# Altium PCB Baseboard-SupervisorCore.PcbDoc (part 3 of 8)
Units mm, origin at the board's own origin, x right, y up, seen from the top; angles counter-clockwise.
Board outline 120 x 90 mm, 6 copper layers (Top Layer, SIGNAL-1, PWR, SIGNAL-2, GND-2, Bottom Layer), stack 1.705 mm thick; 419 components, 315 nets, 1504 pads, 603 vias.
Unrouted connection lines stored in the file: 357.
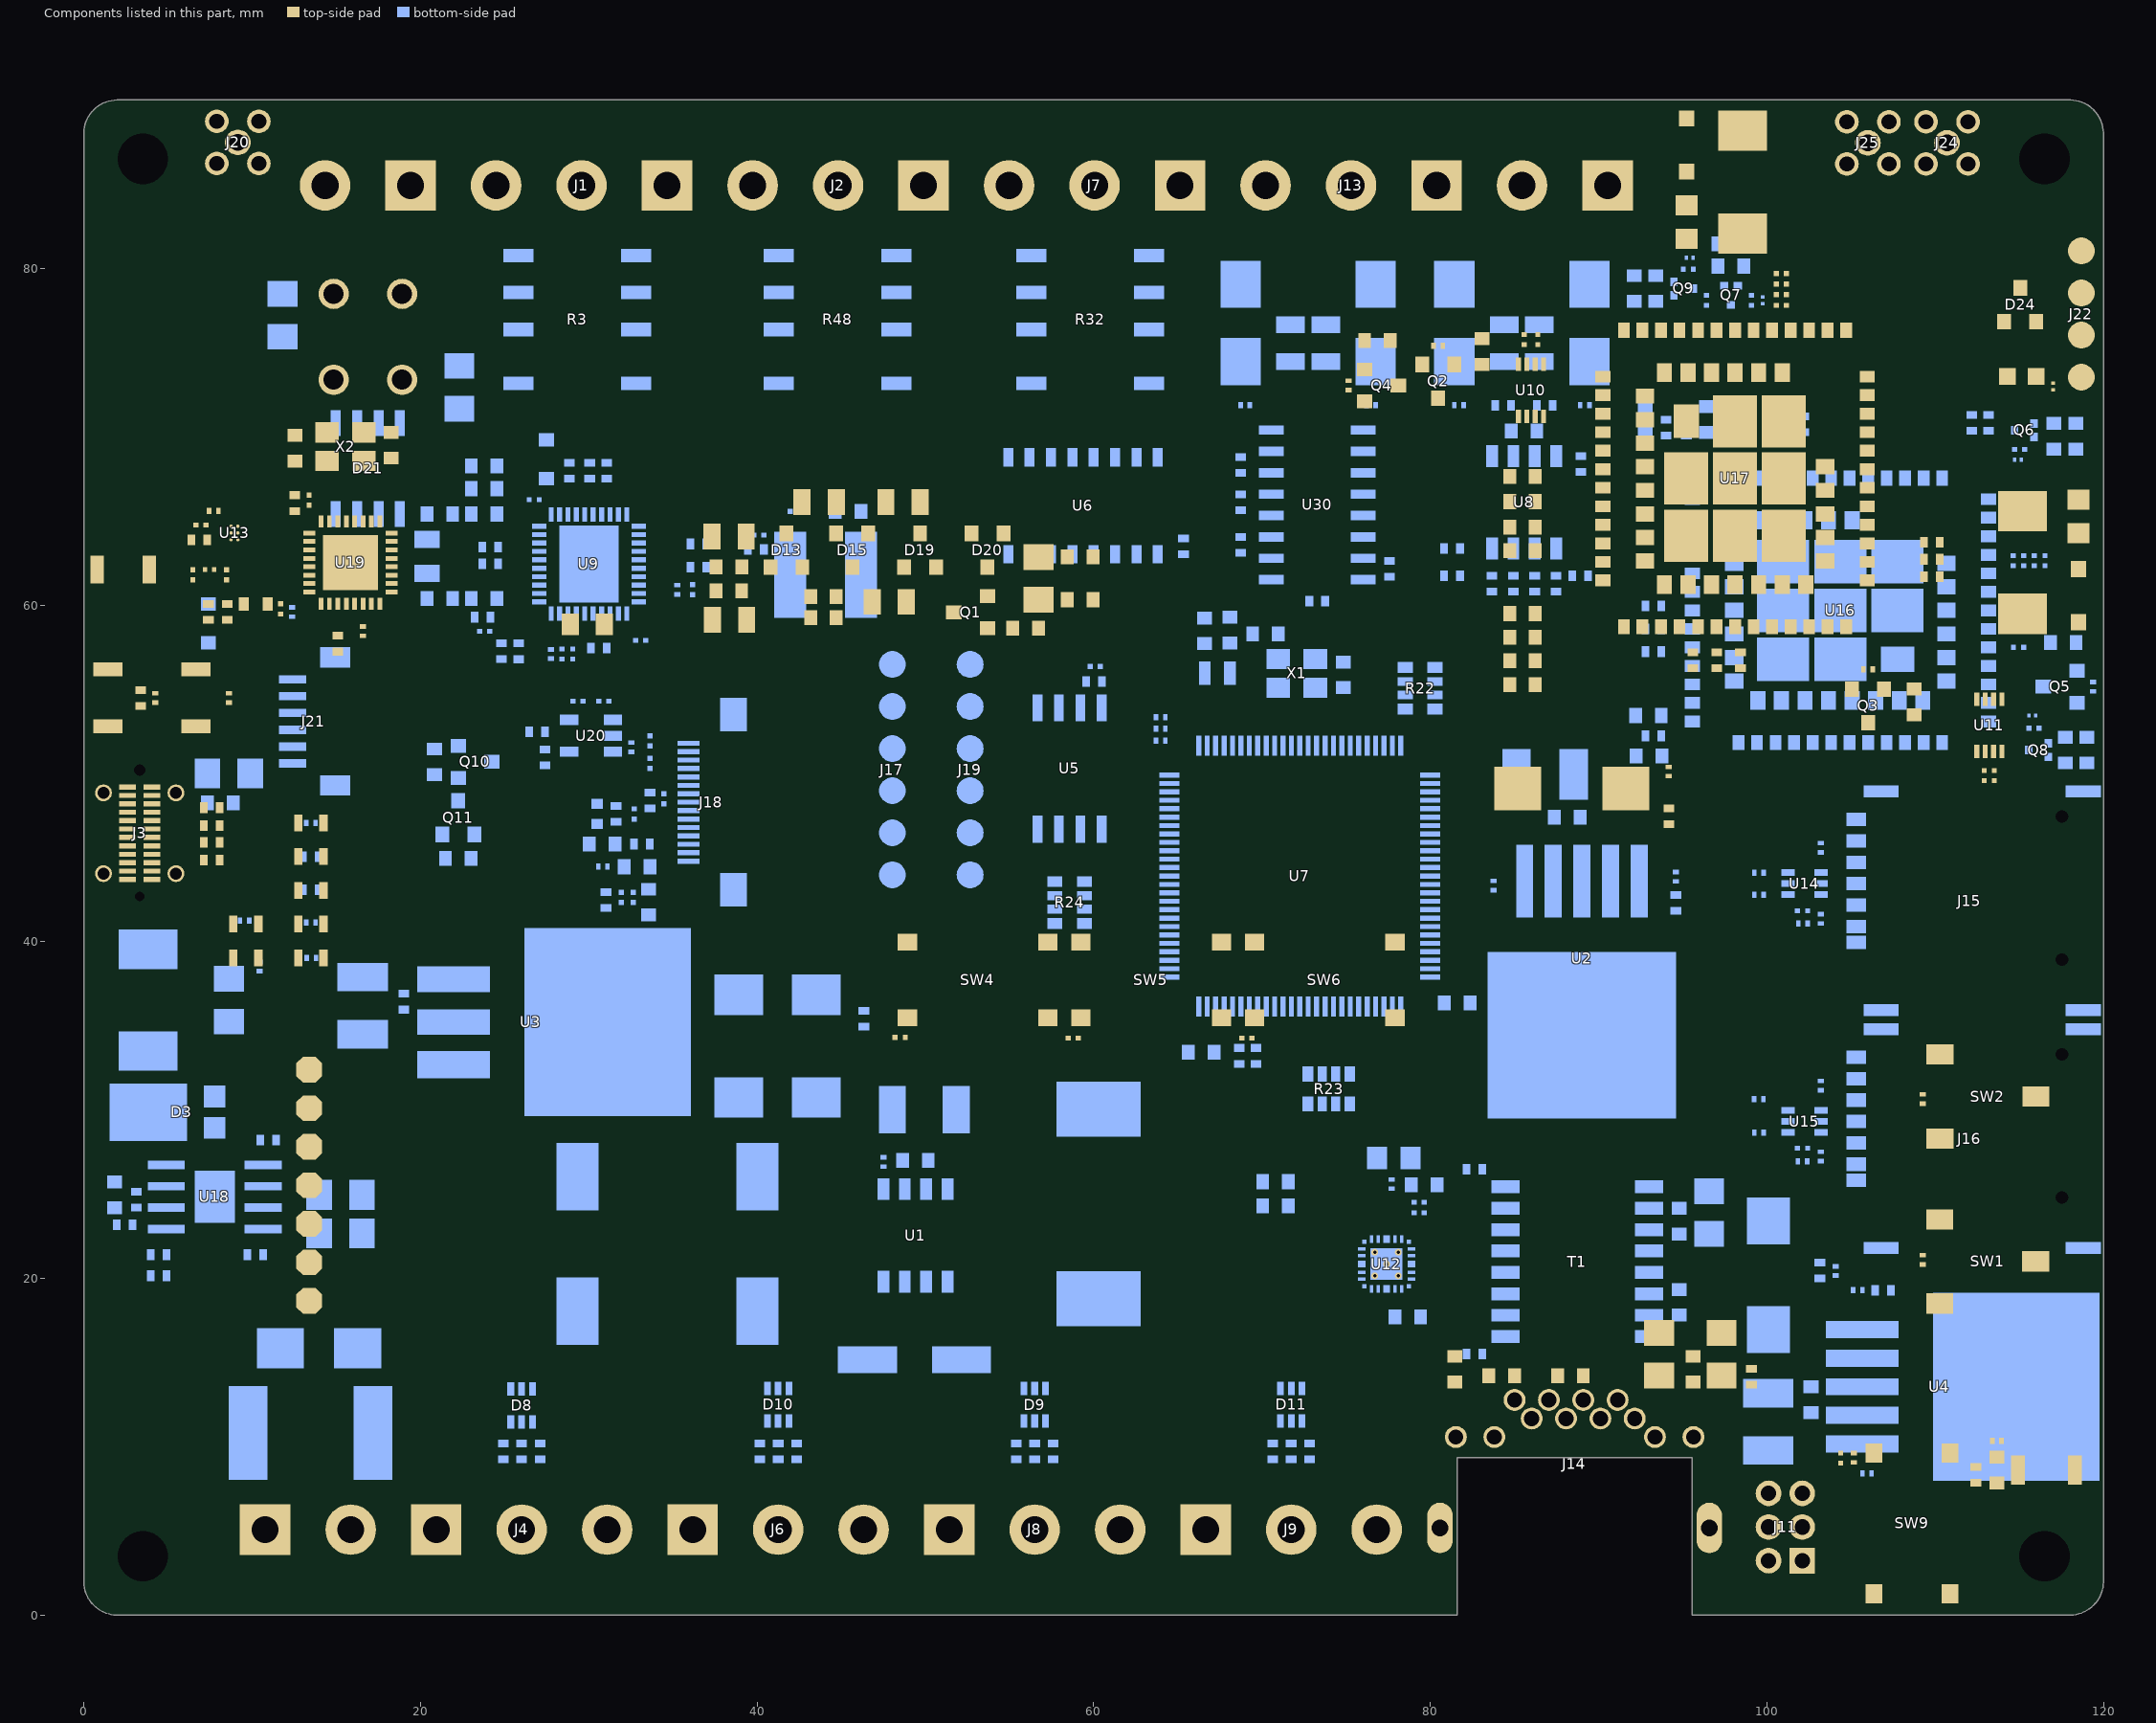
[diagram p6: the components of this part, seen from the top]

## Part data (continued)
C94 C99: library part TAJD227K010RNJ, "CAP TANT 220UF 10% 10V 2917", LCSC Part Number=C8024, Manufacturer="Kyocera AVX", Supplier Part Number=1349925, Category="Tantalum Capacitors", ComponentLink1Description=https://datasheet.ciiva.com/11793/0900766b80ccdc61-11793083.pdf?src-supplier=Rs, ComponentLink1URL=https://datasheet.ciiva.com/11793/0900766b80ccdc61-11793083.pdf?src-supplier=Rs, ComponentLink2Description=https://datasheet.ciiva.com/3004/taj-3004530.pdf?src-supplier=Avnet, ComponentLink2URL=https://datasheet.ciiva.com/3004/taj-3004530.pdf?src-supplier=Avnet, ComponentLink3Description=https://datasheet.ciiva.com/3004/taj-3004531.pdf?src-supplier=Avnet, ComponentLink3URL=https://datasheet.ciiva.com/3004/taj-3004531.pdf?src-supplier=Avnet, ComponentLink4Description=https://datasheet.ciiva.com/264/taj-264391.pdf?src-supplier=Digi-Key, ComponentLink4URL=https://datasheet.ciiva.com/264/taj-264391.pdf?src-supplier=Digi-Key, ComponentLink5Description=https://datasheet.ciiva.com/264/taj-264392.pdf?src-supplier=Digi-Key, ComponentLink5URL=https://datasheet.ciiva.com/264/taj-264392.pdf?src-supplier=Digi-Key, ComponentLink6Description=https://datasheet.ciiva.com/264/taj-264393.pdf?src-supplier=Digi-Key, ComponentLink6URL=https://datasheet.ciiva.com/264/taj-264393.pdf?src-supplier=Digi-Key, ComponentLink7Description=https://datasheet.ciiva.com/15163/getdatasheetpartid-121064-15163429.pdf?src-supplier=Verical, ComponentLink7URL=https://datasheet.ciiva.com/15163/getdatasheetpartid-121064-15163429.pdf?src-supplier=Verical, ComponentLink8Description=https://datasheet.ciiva.com/16201/taj-16201535.pdf?src-supplier=Future+Electronics, ComponentLink8URL=https://datasheet.ciiva.com/16201/taj-16201535.pdf?src-supplier=Future+Electronics, Item Type=Capacitor, Manufacturer Part Number=TAJD227K010RNJ, Pricing="500=0.553, 2500=0.537, 5000=0.523 (GBP)", RoHS=Yes, Stock=100, Supplier=Rs
C102 C123 C124: library part CC0201MRX5R6BB105, "CAP CER 1UF 10V X5R 0201", LCSC Part Number=C605210, Manufacturer=Yageo, Supplier Part Number=311-3474-1-ND, Category="Ceramic Capacitors", ComponentLink1Description=https://datasheet.octopart.com/CC0201MRX5R6BB105-Yageo-datasheet-158238148.pdf?src-supplier=Farnell, ComponentLink1URL=https://datasheet.octopart.com/CC0201MRX5R6BB105-Yageo-datasheet-158238148.pdf?src-supplier=Farnell, ComponentLink2Description=http://www.yageo.com/documents/recent/UPY-GPHC_X5R_4V-to-50V_25.pdf?src-supplier=Digi-Key, ComponentLink2URL=http://www.yageo.com/documents/recent/UPY-GPHC_X5R_4V-to-50V_25.pdf?src-supplier=Digi-Key, ComponentLink3Description=https://datasheet.octopart.com/CC0201MRX5R6BB105-Yageo-datasheet-137700082.pdf?src-supplier=Future+Electronics, ComponentLink3URL=https://datasheet.octopart.com/CC0201MRX5R6BB105-Yageo-datasheet-137700082.pdf?src-supplier=Future+Electronics, Item Type=Capacitor, Manufacturer Part Number=CC0201MRX5R6BB105, Pricing="1=0.19, 10=0.135, 50=0.0764, 100=0.0633, 500=0.04436, 1000=0.03672, 2500=0.03418, 5000=0.03127 (USD)", RoHS=Yes, Stock=772400, Supplier=Digi-Key
C103 C104 C105 C122: library part CC0201KRX5R5BB104, "CAP CER 0.1UF 6.3V X5R 0201", Case Code (Imperial)=0201, Case Code (Metric)=0603, Dielectric=X5R, Manufacturer=Yageo, Max Operating Temperature=85°C, Min Operating Temperature=-55°C, Package Quantity=1, Resistor Type=Ceramic, Tolerance=10%, Voltage Rating=6.3V, Capacitance=100nF, Case/Package=0201, Category="Ceramic Capacitors", ComponentLink1Description=https://datasheet.ciiva.com/7656/1525783-7656597.pdf?src-supplier=Element14, ComponentLink1URL=https://datasheet.ciiva.com/7656/1525783-7656597.pdf?src-supplier=Element14, ComponentLink2Description=https://datasheet.ciiva.com/28450/1359354-28450200.pdf?src-supplier=Element14, ComponentLink2URL=https://datasheet.ciiva.com/28450/1359354-28450200.pdf?src-supplier=Element14, ComponentLink3Description=https://datasheet.ciiva.com/176/mlccorderingcode-176766.pdf?src-supplier=Digi-Key, ComponentLink3URL=https://datasheet.ciiva.com/176/mlccorderingcode-176766.pdf?src-supplier=Digi-Key, ComponentLink4Description=https://datasheet.ciiva.com/176/mlccorderingcode-176765.pdf?src-supplier=Digi-Key, ComponentLink4URL=https://datasheet.ciiva.com/176/mlccorderingcode-176765.pdf?src-supplier=Digi-Key, ComponentLink5Description=https://datasheet.ciiva.com/176/mlccorderingcode-176767.pdf?src-supplier=Digi-Key, ComponentLink5URL=https://datasheet.ciiva.com/176/mlccorderingcode-176767.pdf?src-supplier=Digi-Key, Depth=0.3mm, Halogen Free="Halogen Free", Height=0.3mm, Lead Free="Lead Free", Length=0.6mm, Manufacturer Part Number=CC0201KRX5R5BB104, Mount="Surface Mount", Number of Pins=2, Packaging="Tape and Reel", Pricing 1="15000=0.00238 (USD)", Reach SVHC Compliant=Yes, RoHS=Yes, RoHS Compliant=Yes, Series=CC, Stock 1=1290000, Supplier 1=Avnet, Supplier Part Number 1=CC0201KRX5R5BB104, Termination=SMD/SMT, Thickness=0.013inch, Voltage Rating (DC)=6.3V, Width=0.012inch
C107 C108: library part GRM0335C1H1R3BA01D, "CAP CER 1.3PF 50V C0G/NP0 0201", LCSC Part Number=C237529, Manufacturer=Murata, Temperature Coefficient=30ppm/°C, Category="Ceramic Capacitors", ComponentLink1Description=https://datasheet.ciiva.com/6270/partnumbering-e-01-6270997.pdf?src-supplier=Digi-Key, ComponentLink1URL=https://datasheet.ciiva.com/6270/partnumbering-e-01-6270997.pdf?src-supplier=Digi-Key, ComponentLink2Description=https://datasheet.ciiva.com/6271/partnumbering-e-01-6271000.pdf?src-supplier=Digi-Key, ComponentLink2URL=https://datasheet.ciiva.com/6271/partnumbering-e-01-6271000.pdf?src-supplier=Digi-Key, ComponentLink3Description=https://datasheet.ciiva.com/6271/partnumbering-e-01-6271002.pdf?src-supplier=Digi-Key, ComponentLink3URL=https://datasheet.ciiva.com/6271/partnumbering-e-01-6271002.pdf?src-supplier=Digi-Key, Height=330um, Item Type=Capacitor, Manufacturer Part Number=GRM0335C1H1R3BA01D, Material=4241ConductorMaterial, Pricing 1="15000=0.0024, 30000=0.0022, 75000=0.0018, 105000=0.0016, 150000=0.0015 (USD)", RoHS=Yes, Stock 1=135000, Supplier 1="Arrow Electronics", Supplier Part Number 1=GRM0335C1H1R3BA01D
C109 C132: library part CC1206KKX7RDBB102, "CAP CER 1000PF 2KV X7R 1206", Capacitance=1nF, Case Code (Imperial)=1206, Case Code (Metric)=3216, Dielectric=X7R, Insulation Resistance=10GR, LCSC Part Number=C23631, Manufacturer=Yageo, Max Operating Temperature=125°C, Min Operating Temperature=-55°C, Package Quantity=1, Resistor Type=Ceramic, Supplier Part Number 1=311-1487-1-ND, Tolerance=10%, Voltage=2kV, Case/Package=1206, Category="Ceramic Capacitors", ComponentLink1Description=https://datasheet.ciiva.com/23942/1449957-23942422.pdf?src-supplier=Newark, ComponentLink1URL=https://datasheet.ciiva.com/23942/1449957-23942422.pdf?src-supplier=Newark, ComponentLink2Description=https://datasheet.ciiva.com/186/upy-np0x7r-hv-1kv-to-3kv-4-186736.pdf?src-supplier=Digi-Key, ComponentLink2URL=https://datasheet.ciiva.com/186/upy-np0x7r-hv-1kv-to-3kv-4-186736.pdf?src-supplier=Digi-Key, ComponentLink3Description=https://datasheet.ciiva.com/186/upy-np0x7r-hv-1kv-to-3kv-4-186737.pdf?src-supplier=Digi-Key, ComponentLink3URL=https://datasheet.ciiva.com/186/upy-np0x7r-hv-1kv-to-3kv-4-186737.pdf?src-supplier=Digi-Key, ComponentLink4Description=https://datasheet.ciiva.com/13386/upy-gp-np0-16v-to-50v-8-13386312.pdf?src-supplier=Mouser, ComponentLink4URL=https://datasheet.ciiva.com/13386/upy-gp-np0-16v-to-50v-8-13386312.pdf?src-supplier=Mouser, ComponentLink5Description=https://datasheet.ciiva.com/186/upy-np0x7r-hv-1kv-to-3kv-4-186735.pdf?src-supplier=Digi-Key, ComponentLink5URL=https://datasheet.ciiva.com/186/upy-np0x7r-hv-1kv-to-3kv-4-186735.pdf?src-supplier=Digi-Key, Construction=Flat, Depth=1.6mm, Dissipation Factor=2.5%, Height=1.25mm, Item Type=Capacitor, Lead Free="Lead Free", Length=3.2mm, Manufacturer Part Number=CC1206KKX7RDBB102, Mount="Surface Mount", Number of Pins=2, Packaging="Tape and Reel", Pricing 1="1=0.35000, 10=0.24000, 50=0.16780, 100=0.14390, 500=0.10794, 1000=0.09114 (USD)", Radiation Hardening=No, REACH SVHC=Unknown, RoHS=Yes, RoHS Compliant=Yes, Series=CC, Stock 1=19260, Supplier 1=Digi-Key, Termination=SMD/SMT, Thickness=0.057inch, Voltage Rating=2kV, Voltage Rating (DC)=2kV, Width=0.063inch
C110 C111 C112 C113 C115 C118 C119 C120 C121: library part CC0402JRNPO9BN220, "CAP CER 22PF 50V C0G/NPO 0402", Case Code (Imperial)=0402, Case Code (Metric)=1005, Dielectric=C0G, Dielectric Material=Ceramic, Insulation Resistance=100GR, LCSC Part Number=C106203, Manufacturer=Yageo, Max Operating Temperature=125°C, Min Operating Temperature=-55°C, Package Quantity=1, Supplier Part Number 1=9105957, Temperature Coefficient=30ppm/°C, Tolerance=5%, Voltage=50V, Case/Package=0402, Category="Ceramic Capacitors", ComponentLink1Description=https://datasheet.ciiva.com/5789/1443161-5789509.pdf?src-supplier=Farnell, ComponentLink1URL=https://datasheet.ciiva.com/5789/1443161-5789509.pdf?src-supplier=Farnell, ComponentLink2Description=https://datasheet.ciiva.com/8033/1443161-8033606.pdf?src-supplier=Element14, ComponentLink2URL=https://datasheet.ciiva.com/8033/1443161-8033606.pdf?src-supplier=Element14, ComponentLink3Description=https://datasheet.ciiva.com/7656/1132289-7656615.pdf?src-supplier=Element14, ComponentLink3URL=https://datasheet.ciiva.com/7656/1132289-7656615.pdf?src-supplier=Element14, ComponentLink4Description=https://datasheet.ciiva.com/8033/1443161-8033607.pdf?src-supplier=Element14, ComponentLink4URL=https://datasheet.ciiva.com/8033/1443161-8033607.pdf?src-supplier=Element14, ComponentLink5Description=https://datasheet.ciiva.com/8033/1443161-8033605.pdf?src-supplier=Element14, ComponentLink5URL=https://datasheet.ciiva.com/8033/1443161-8033605.pdf?src-supplier=Element14, ComponentLink6Description=https://datasheet.ciiva.com/143/mlccorderingcode-143987.pdf?src-supplier=Digi-Key, ComponentLink6URL=https://datasheet.ciiva.com/143/mlccorderingcode-143987.pdf?src-supplier=Digi-Key, ComponentLink7Description=https://datasheet.ciiva.com/143/mlccorderingcode-143986.pdf?src-supplier=Digi-Key, ComponentLink7URL=https://datasheet.ciiva.com/143/mlccorderingcode-143986.pdf?src-supplier=Digi-Key, ComponentLink8Description=https://datasheet.ciiva.com/143/mlccorderingcode-143988.pdf?src-supplier=Digi-Key, ComponentLink8URL=https://datasheet.ciiva.com/143/mlccorderingcode-143988.pdf?src-supplier=Digi-Key, ComponentLink9Description=https://datasheet.ciiva.com/5425/upy-gp-np0-16v-to-50v-8-5425483.pdf?src-supplier=Mouser, ComponentLink9URL=https://datasheet.ciiva.com/5425/upy-gp-np0-16v-to-50v-8-5425483.pdf?src-supplier=Mouser, ComponentLink10Description=https://datasheet.ciiva.com/15189/getdatasheetpartid-370074-15189117.pdf?src-supplier=Verical, ComponentLink10URL=https://datasheet.ciiva.com/15189/getdatasheetpartid-370074-15189117.pdf?src-supplier=Verical, Depth=0.5mm, Height=0.5mm, Item Type=Capacitor, Lead Free="Lead Free", Length=1mm, Manufacturer Part Number=CC0402JRNPO9BN220, Mounting Technology="Surface Mount", Packaging="Tape and Reel", Pins=2, Pricing 1="10000=0.00220, 40000=0.00210, 150000=0.00200, 400000=0.00190, 1000000=0.00180 (USD)", Radiation Hardening=No, Reach SVHC Compliant=Yes, Resistor Type=Ceramic, RoHS=Yes, RoHS Compliant=Yes, Series=CC, Stock 1=200000, Supplier 1="Future Electronics", Termination=SMD/SMT, Thickness=0.022inch, Voltage Rating=50V, Voltage Rating (DC)=50V, Width=0.02inch
C128 C131: library part CC0402MRX5R6BB106, "CAP CER 10UF 10V X5R 0402", Case Code (Imperial)=0402, Case Code (Metric)=1005, LCSC Part Number=C962143, Manufacturer=Yageo, Max Operating Temperature=85°C, Min Operating Temperature=-55°C, Supplier Part Number 1=6097631, Tolerance=20%, Voltage Rating=10V, Capacitance=10uF, Case/Package=0402, Category="Ceramic Capacitors", ComponentLink1Description=http://www.yageo.com/documents/recent/UPY-GPHC_X5R_4V-to-50V_25.pdf?src-supplier=Digi-Key, ComponentLink1URL=http://www.yageo.com/documents/recent/UPY-GPHC_X5R_4V-to-50V_25.pdf?src-supplier=Digi-Key, Item Type=Capacitor, Manufacturer Part Number=CC0402MRX5R6BB106, Mount="Surface Mount", Packaging="Tape and Reel", Pricing 1="10000=0.02650, 20000=0.02590, 30000=0.02550, 40000=0.02530, 50000=0.02450 (USD)", RoHS=Yes, RoHS Compliant=Yes, Stock 1=80000, Supplier 1="Future Electronics"
D2: "58.1V 40V 36V Bi-Directional SMB(DO-214AA) TVS ROHS", LCSC Part Number=C556189, Manufacturer="Slkor(SLKORMICRO Elec.)", Package=SMB(DO-214AA), ComponentLink1Description=LCSC, ComponentLink1URL=https://www.lcsc.com/product-detail/span-style-background-color-ff0-TVS-span_Slkor-SLKORMICRO-Elec-SMBJ36CA_C556189.html, Item Type=Diode, Manufacturer Part Number=SMBJ36CA
D3: "100V Dual Common Cathode 10A 670mV@10A TO-277 Schottky Barrier Diodes (SBD) ROHS", LCSC Part Number=C2903949, Manufacturer=GOODWORK, Package=TO-277, ComponentLink1Description=LCSC, ComponentLink1URL=https://www.lcsc.com/product-detail/Schottky-Barrier-Diodes-SBD_GOODWORK-SL10100_C2903949.html, Item Type=Diode, Manufacturer Part Number=SL10100
D4: "15V 19A 3.3V 4V Bidirectional SOD-323 ESD Protection Devices ROHS", LCSC Part Number=C78439, Manufacturer=Brightking, ComponentLink1Description=LCSC, ComponentLink1URL=https://lcsc.com/product-detail/span-style-background-color-ff0-ESD-span-Protection-Devices_Brightking-Elec-TAIWAN-UDD32C03L01_C78439.html, Item Type="ESD Diode", Manufacturer Part Number=UDD32C03L01
D7: "40V 3A 550mV@3A SMA(DO-214AC) Schottky Barrier Diodes (SBD) ROHS", LCSC Part Number=C3018525, Manufacturer=FUXINSEMI, Package=SMA(DO-214AC), ComponentLink1Description=LCSC, ComponentLink1URL=https://www.lcsc.com/product-detail/Schottky-Barrier-Diodes-SBD_FUXINSEMI-B340A_C3018525.html, Item Type=Diode, Manufacturer Part Number=B340A
D8 D9 D10 D11: "DIODE ZENER ARRAY 3.3V SOT363", LCSC Part Number=C5124989, Manufacturer="Diodes Incorporated", Package=SOT-363-6, ComponentLink1Description=LCSC, ComponentLink1URL=https://www.lcsc.com/product-detail/Zener-Diodes_Diodes-Incorporated-BZX84C3V3TS-7-F_C5124989.html, Item Type=Diode, Manufacturer Part Number=BZX84C3V3TS-7-F
D12: "250V 200mW Single 1.25V 50ns 200mA SOD-323 Switching Diode ROHS", LCSC Part Number=C12742, Manufacturer=LRC, Package=SOD-323, ComponentLink1Description=LCSC, ComponentLink1URL=https://www.lcsc.com/product-detail/Switching-Diode_LRC-LBAS21HT1G_C12742.html, Item Type=Diode, Manufacturer Part Number=LBAS21HT1G
D13 D15 D19 D20: "70V 225mW Dual Common Cathode 1.25V@150mA 6ns 200mA SOT-23 Switching Diode ROHS", LCSC Part Number=C727123, Manufacturer=TWGMC, Package=SOT-23, ComponentLink1Description=LCSC, ComponentLink1URL=https://www.lcsc.com/product-detail/Switching-Diode_TWGMC-BAV70_C727123.html, Item Type=Diode, Manufacturer Part Number=BAV70
D14 D16 D17 D22 D23: "TVS DIODE 5VWM 6.3VC DSN0603-2", LCSC Part Number=C477989, Manufacturer=Nexperia, Category="ESD and Circuit Protection ICs", ComponentLink1Description=http://www.farnell.com/datasheets/1961312.pdf?src-supplier=Farnell, ComponentLink1URL=http://www.farnell.com/datasheets/1961312.pdf?src-supplier=Farnell, ComponentLink2Description=https://assets.nexperia.com/documents/data-sheet/PESD5V0H1BSF.pdf?src-supplier=Digi-Key, ComponentLink2URL=https://assets.nexperia.com/documents/data-sheet/PESD5V0H1BSF.pdf?src-supplier=Digi-Key, ComponentLink3Description=http://www.farnell.com/datasheets/1961312.pdf?src-supplier=Newark, ComponentLink3URL=http://www.farnell.com/datasheets/1961312.pdf?src-supplier=Newark, Item Type=Diode, Manufacturer Part Number=PESD5V0H1BSFYL, Pricing 1="18000=0.06453, 36000=0.06278, 54000=0.06104, 90000=0.05930, 180000=0.05755, 900000=0.05581, 1800000=0.05406 (USD)", RoHS=Yes, RoHS Compliant=Yes, Stock 1=9000, Supplier 1=Avnet, Supplier Part Number 1=PESD5V0H1BSFYL
D18 D25: "DIODE ZENER 5.1V 500MW SOD123", Breakdown Voltage=5.36V, Case/Package=SOD-123-2, Forward Voltage=900mV, LCSC Part Number=C66198, Manufacturer="ON Semiconductor", Max Operating Temperature=150°C, Max Power Dissipation=500mW, Max Reverse Current=5uA, Min Operating Temperature=-55°C, Package Quantity=3000, Supplier Part Number 1=70099546, Test Current=20mA, Tolerance=5%, Voltage Rating (DC)=5.1V, Zener Current=10mA, Category="Zener Diodes", ComponentLink1Description=https://datasheet.ciiva.com/23815/1708301-23815376.pdf?src-supplier=Newark, ComponentLink1URL=https://datasheet.ciiva.com/23815/1708301-23815376.pdf?src-supplier=Newark, ComponentLink2Description=https://datasheet.ciiva.com/22626/1708301-22626967.pdf?src-supplier=Element14, ComponentLink2URL=https://datasheet.ciiva.com/22626/1708301-22626967.pdf?src-supplier=Element14, ComponentLink3Description=https://datasheet.ciiva.com/4731/mmsz5221bt1-d-4731452.pdf?src-supplier=Mouser, ComponentLink3URL=https://datasheet.ciiva.com/4731/mmsz5221bt1-d-4731452.pdf?src-supplier=Mouser, ComponentLink4Description=https://datasheet.ciiva.com/16200/mmsz5221bt1-d-16200104.pdf?src-supplier=Future+Electronics, ComponentLink4URL=https://datasheet.ciiva.com/16200/mmsz5221bt1-d-16200104.pdf?src-supplier=Future+Electronics, ComponentLink5Description=https://datasheet.ciiva.com/894/mmsz5221bt1-d-894882.pdf?src-supplier=Digi-Key, ComponentLink5URL=https://datasheet.ciiva.com/894/mmsz5221bt1-d-894882.pdf?src-supplier=Digi-Key, ComponentLink6Description=https://datasheet.ciiva.com/894/mmsz5221bt1-d-894883.pdf?src-supplier=Digi-Key, ComponentLink6URL=https://datasheet.ciiva.com/894/mmsz5221bt1-d-894883.pdf?src-supplier=Digi-Key, ComponentLink7Description=https://datasheet.ciiva.com/894/mmsz5221bt1-d-894881.pdf?src-supplier=Digi-Key, ComponentLink7URL=https://datasheet.ciiva.com/894/mmsz5221bt1-d-894881.pdf?src-supplier=Digi-Key, Height=1.12mm, Impedance=17R, Item Type=Diode, Lead Free="Lead Free", Length=2.69mm, Manufacturer Part Number=MMSZ5231BT1G, Material=Plastic, Max Reverse Leakage Current=5uA, Packaging="Tape and Reel", Pins=2, Power Dissipation=500mW, Power Rating=500mW, Reach SVHC Compliant=No, RoHS=Yes, RoHS Compliant=Yes, Series="Automotive, AEC-Q101", Supplier 1="Allied Electronics", Voltage Tolerance=5%, Width=1.6mm, Working Voltage=5.1V, Zener Voltage=5.1V
D21: "THYRISTOR 170V 30A 8SOIC", Case/Package=SOIC, Current Rating=-5uA, Forward Voltage=3V, Hold Current=150mA, LCSC Part Number=C415877, Manufacturer=Bourns, Max Operating Temperature=85°C, Max Repetitive Reverse Voltage (Vrrm)=170V, Min Operating Temperature=-40°C, Package Quantity=2500, Peak Pulse Current=30A, Supplier Part Number=TISP61089BDR-SCT-ND, Category=TRIACs, ComponentLink1Description=https://datasheet.ciiva.com/30076/tisp61089b-30076825.pdf?src-supplier=Onlinecomponents.com, ComponentLink1URL=https://datasheet.ciiva.com/30076/tisp61089b-30076825.pdf?src-supplier=Onlinecomponents.com, ComponentLink2Description=https://datasheet.ciiva.com/46364/2035135-46364842.pdf?src-supplier=Jameco, ComponentLink2URL=https://datasheet.ciiva.com/46364/2035135-46364842.pdf?src-supplier=Jameco, ComponentLink3Description=https://datasheet.ciiva.com/4744/tisp61089b-75813-4744776.pdf?src-supplier=Mouser, ComponentLink3URL=https://datasheet.ciiva.com/4744/tisp61089b-75813-4744776.pdf?src-supplier=Mouser, ComponentLink4Description=https://datasheet.ciiva.com/362/tisp61089b-362311.pdf?src-supplier=Digikey, ComponentLink4URL=https://datasheet.ciiva.com/362/tisp61089b-362311.pdf?src-supplier=Digikey, Height=1.55mm, Item Type=(TVS/ESD), Lead Free="Lead Free", Length=5mm, Manufacturer Part Number=TISP61089BDR-S, Mounting Technology="Surface Mount", Number of Circuits=2, Number of Elements=2, Operating Supply Voltage=3V, Packaging="Tape and Reel", Pins=8, Pricing="1=1.38, 10=1.129, 100=0.8781, 500=0.74428, 1000=0.6063 (USD)", Radiation Hardening=No, Reach SVHC Compliant=No, RoHS=Yes, RoHS Compliant=Yes, Series=-, Stock=22616, Supplier=Digikey, Weight=0.004762oz, Width=4mm
D24: "16A 20V 7V 5V@Max Unidirectional SOT-23 TVS ROHS", LCSC Part Number=C239643, Manufacturer=WILLSEMI, Package=SOT-23, ComponentLink1Description=LCSC, ComponentLink1URL=https://www.lcsc.com/product-detail/TVS_WILLSEMI-Will-Semicon-ESD5302F-3-TR_C239643.html, Item Type=Diode, Manufacturer Part Number=ESD5302F-3/TR
D26: "80V Single 1.2V@100mA 4ns 100mA SOD-523 Switching Diode ROHS", LCSC Part Number=C2836063, Manufacturer=CBI, Package=SOD-523, ComponentLink1Description=LCSC, ComponentLink1URL=https://www.lcsc.com/product-detail/Switching-Diode_CBI-1SS355WT_C2836063.html, Item Type=Diode, Manufacturer Part Number=1SS355WT
D40 D41 D42 D43: "SMB(DO-214AA) TVS ROHS", LCSC Part Number=C5331111, Manufacturer=MSKSEMI, Package=SMB(DO-214AA), ComponentLink1Description=LCSC, ComponentLink1URL=https://www.lcsc.com/product-detail/TVS_MSKSEMI-SMBJ26CA_C5331111.html, Item Type=Diode, Manufacturer Part Number=SMBJ26CA
F2: "30V 5A 5A 2920 Resettable Fuses ROHS", LCSC Part Number=C495350, Manufacturer="PTTC(Polytronics Tech)", Package=2920, ComponentLink1Description=LCSC, ComponentLink1URL=https://www.lcsc.com/product-detail/Resettable-Fuses_PTTC-Polytronics-Tech-SHV2920P500-30-AA_C495350.html, Item Type=Fuse, Manufacturer Part Number=SHV2920P500-30-AA
F3: "6V 500mA 40A 1A 0603 Resettable Fuses ROHS", LCSC Part Number=C69679, Manufacturer=TECHFUSE, Category=Uncategorized, ComponentLink1Description=LCSC, ComponentLink1URL=https://www.lcsc.com/product-detail/Resettable-Fuses_TECHFUSE-SMD0603-050_C69679.html, Item Type=Fuse, Manufacturer Part Number=SMD0603-050, RoHS=No, Supplier 1=LCSC, Supplier Part Number 1=C69679
F4 F5: "250V 80mA 3A 160mA Plugin Resettable Fuses ROHS", LCSC Part Number=C369127, Manufacturer="Jinrui Electronic Materials Co.", Package=Plugin, ComponentLink1Description=LCSC, ComponentLink1URL=https://www.lcsc.com/product-detail/Resettable-Fuses_Jinrui-Electronic-Materials-Co-JK250-080U_C369127.html, Item Type=Fuse, Manufacturer Part Number=JK250-080U
F19 F20 F21 F22: "9V 200mA 100A 500mA 0805 Resettable Fuses ROHS", LCSC Part Number=C20976, Manufacturer=RUILON, Package=0805, ComponentLink1Description=LCSC, ComponentLink1URL=https://www.lcsc.com/product-detail/Resettable-Fuses_RUILON-Shenzhen-Ruilongyuan-Elec-SMD0805P020TF_C20976.html, Item Type=Fuse, Manufacturer Part Number=SMD0805P020TF
FB2 FB3 FB4: library part BLM21PG300SN1D, "FERRITE BEAD 30 OHM 0805 1LN", Case Code (Imperial)=0805, Case Code (Metric)=2012, Current Rating=4A, DC Current=3A, DC Resistance (DCR)=14mR, LCSC Part Number=C16903, Max Operating Temperature=125°C, Min Operating Temperature=-55°C, Package Quantity=1, Supplier Part Number=7241536P, Tolerance=25%, Case/Package=0805, Category="Ferrite Beads and Chips", ComponentLink1Description=LCSC, ComponentLink2Description=https://datasheet.ciiva.com/19460/1845339-19460237.pdf?src-supplier=Jameco, ComponentLink2URL=https://datasheet.ciiva.com/19460/1845339-19460237.pdf?src-supplier=Jameco, ComponentLink3Description=https://datasheet.ciiva.com/11795/0900766b80021a8e-11795584.pdf?src-supplier=Rs, ComponentLink3URL=https://datasheet.ciiva.com/11795/0900766b80021a8e-11795584.pdf?src-supplier=Rs, ComponentLink4Description=https://datasheet.ciiva.com/8021/1756152-8021599.pdf?src-supplier=Element14, ComponentLink4URL=https://datasheet.ciiva.com/8021/1756152-8021599.pdf?src-supplier=Element14, ComponentLink5Description=https://datasheet.ciiva.com/6212/l0110s0100blm21p-6212358.pdf?src-supplier=Digi-Key, ComponentLink5URL=https://datasheet.ciiva.com/6212/l0110s0100blm21p-6212358.pdf?src-supplier=Digi-Key, ComponentLink6Description=https://datasheet.ciiva.com/6212/l0110s0100blm21p-6212360.pdf?src-supplier=Digi-Key, ComponentLink6URL=https://datasheet.ciiva.com/6212/l0110s0100blm21p-6212360.pdf?src-supplier=Digi-Key, ComponentLink7Description=https://datasheet.ciiva.com/3081/l0110s0100blm21p-3081657.pdf?src-supplier=Avnet, ComponentLink7URL=https://datasheet.ciiva.com/3081/l0110s0100blm21p-3081657.pdf?src-supplier=Avnet, ComponentLink8Description=https://datasheet.ciiva.com/16199/l0110s0100blm21p-16199625.pdf?src-supplier=Future+Electronics, ComponentLink8URL=https://datasheet.ciiva.com/16199/l0110s0100blm21p-16199625.pdf?src-supplier=Future+Electronics, ComponentLink9Description=https://datasheet.ciiva.com/3081/l0110s0100blm21p-3081658.pdf?src-supplier=Avnet, ComponentLink9URL=https://datasheet.ciiva.com/3081/l0110s0100blm21p-3081658.pdf?src-supplier=Avnet, ComponentLink10Description=https://datasheet.ciiva.com/41449/001172365-da-01-en-drossel-0805-30r0-2-0x1-25mm-4000st-41449606.pdf?src-supplier=Conrad, ComponentLink10URL=https://datasheet.ciiva.com/41449/001172365-da-01-en-drossel-0805-30r0-2-0x1-25mm-4000st-41449606.pdf?src-supplier=Conrad, Core Material=Ferrite, DC Resistance-Max=14mR, Depth=1.25mm, ESR=14mR, Frequency=100MHz, Height=0.85mm, Impedance=30R, Item Type="Ferrite Bead", Lead Free="Lead Free", Length=2mm, Material=Steel,Ferrite, Max Current Rating=4A, Max DC Current=3A, Military Standard=Not, Number of Circuits=1, Number of Lines=1, Packaging="Tape and Reel", Pins=2, Pricing="500=0.043, 1000=0.038, 2500=0.033, 5000=0.03 (GBP)", Radiation Hardening=No, Reach SVHC Compliant=No, RMS Current (Irms)=4A, RoHS=Yes, RoHS Compliant=Yes, Series=BLM21P, Shielding=Unshielded, Stock=11575, Supplier=Rs, Termination=SMD/SMT, Test Frequency=100MHz, Width=1.25mm
J1 J2 J4 J6 J7 J8 J9 J13: "1x3P 18A -40℃~+105℃ 250V Black 12~30 Straight pin 5.08mm 2.5 1 3 Plugin,P=5.08mm Screw terminal ROHS", LCSC Part Number=C430602, Manufacturer=DIBO, Package=Plugin,P=5.08mm, ComponentLink1Description=LCSC, ComponentLink1URL=https://www.lcsc.com/product-detail/Screw-terminal_DIBO-DB128L-5-08-3P-BK-S_C430602.html, Item Type="Terminal Block", Manufacturer Part Number=DB128L-5.08-3P-BK-S
J3: "USB 3.0 3A 1 Brick nogging 24 Female -35℃~+75℃ Type-C SMD USB Connectors ROHS", LCSC Part Number=C2977724, Manufacturer=SOFNG, ComponentLink1Description=LCSC, ComponentLink1URL=https://www.lcsc.com/product-detail/USB-Connectors_SOFNG-MC-318FB_C2977724.html, Manufacturer Part Number=MC-318FB
J5 J10 J12: "1x2P 18A -40℃~+105℃ 250V Black 12~30 Straight pin 5.08mm 2.5 1 2 Plugin,P=5.08mm Screw terminal ROHS", LCSC Part Number=C430601, Manufacturer=DIBO, Package=Plugin,P=5.08mm, ComponentLink1Description=LCSC, ComponentLink1URL=https://www.lcsc.com/product-detail/Screw-terminal_span-style-background-color-ff0-DIBO-span-DB128L-5-08-2P-BK-S_C430601.html, Item Type="Terminal Block", Manufacturer Part Number=DB128L-5.08-2P-BK-S
J11: "2x3P 2 2mm 2mm male 3 -25℃~+85℃ 3A Straight Plugin,P=2mm Wire To Board / Wire To Wire Connector ROHS", LCSC Part Number=C469723, Manufacturer="HX(Zhejiang Yueqing Hongxing Elec)", Package=Plugin,P=2mm, ComponentLink1Description=LCSC, ComponentLink1URL=https://jlcpcb.com/partdetail/475972-HX20012_6Ablack/C469723, Item Type="Wire To Wire Connector", Manufacturer Part Number="HX20012-6A black"
J14: "RJ45 RJReceptacle 1 有屏蔽 Sink board WithLED -40℃~+70℃ Plugin Ethernet Connectors/Modular Connectors (RJ45 RJ11) ROHS", LCSC Part Number=C708648, Manufacturer=RCH, Package=Plugin, ComponentLink1Description=LCSC, ComponentLink1URL=https://www.lcsc.com/product-detail/Ethernet-Connectors-Modular-Connectors-RJ45-RJ11_RCH-RC01835_C708648.html, Item Type=Ethernet, Manufacturer Part Number=RC01835
J15 J16: "Copper Alloy Self bomb Gold plating 1.25mm Deck -40℃~+85℃ 260℃ NanoSIM SMD SIM Card Connectors ROHS", LCSC Part Number=C381071, Manufacturer="XKB Connectivity", Package="SMD Custom", ComponentLink1Description=LCSC, ComponentLink1URL=https://www.lcsc.com/product-detail/SIM-Card-Connectors_XKB-Connectivity-XKNANO-113_C381071.html, Item Type="SIM Card Connectors", Manufacturer Part Number=XKNANO-113
J17: library part "POGO Connector 6 Pin", "Pogo Pad 2.5mm 6 Pin"
J18: "Clamshell 15 Bottom Contact Surface Mount 0.5mm SMD,P=0.5mm FFC/FPC Connectors ROHS", LCSC Part Number=C262271, Manufacturer=JUSHUO, Package=SMD,P=0.5mm, ComponentLink1Description=LCSC, ComponentLink1URL=https://www.lcsc.com/product-detail/FFC-FPC-Connectors_JUSHUO-AFC01-S15FCC-00_C262271.html, Item Type="FPC Connector", Manufacturer Part Number=AFC01-S15FCC-00
J19: "Pogo Pad 2.5mm 6 Pin"
J20 J24 J25: "1 Inner bore MCX/MMCX Board Edge Bend 6.8mm 6GHz 50Ω 3.45mm Plugin RF Connectors / Coaxial Connectors ROHS", LCSC Part Number=C5137199, Manufacturer="BAT WIRELESS", ComponentLink1Description=LCSC, ComponentLink1URL=https://www.lcsc.com/product-detail/RF-Connectors-Coaxial-Connectors_BAT-WIRELESS-BWMMCX-KWE_C5137199.html, Item Type="Coaxial Connector", Manufacturer Part Number=BWMMCX-KWE
J21: library part C145963, "1x6P SH 1 1mm 6 SMD,P=1mm Wire To Board / Wire To Wire Connector ROHS", Manufacturer=BOOMELE, Package=SMD,P=1mm, ComponentLink1Description=LCSC, ComponentLink1URL=https://www.lcsc.com/product-detail/Wire-To-Board-Wire-To-Wire-Connector_BOOMELE-Boom-Precision-Elec-C145963_C145963.html, Item Type=Connector, LCSC Part Number=C145963, Manufacturer Part Number=C145963
J22: "Pogo Pad 2.5mm 4 Pin", Item Type="Pogo Connector", Manufacturer Part Number="POGO Connector 4 Pin"
L1: library part FXL0630-5R6-M, "5.5A 5.6uH Molding Choke ±20% 6.5A SMD,6.6x7mm Power Inductors ROHS", LCSC Part Number=C475914, Manufacturer=cjiang, Package=SMD,6.6x7mm, ComponentLink1Description=LCSC, ComponentLink1URL=https://www.lcsc.com/product-detail/Power-Inductors_cjiang-Changjiang-Microelectronics-Tech-FXL0630-5R6-M_C475914.html, Item Type=Inductor, Manufacturer Part Number=FXL0630-5R6-M
L2: library part TMPA1265SP-101MN-D, "3.8A 100uH ±20% SMD,12.6x13.5mm Power Inductors ROHS", LCSC Part Number=C357118, Manufacturer=TAI-TECH, Package=SMD,12.6x13.5mm, ComponentLink1Description=LCSC, ComponentLink1URL=https://www.lcsc.com/product-detail/Power-Inductors_TAI-TECH-TMPA1265SP-101MN-D_C357118.html, Item Type=Inductor, Manufacturer Part Number=TMPA1265SP-101MN-D
L3: library part VLS6045AF-150M, "FIXED IND 15UH 2.8A 77 MOHM SMD", Case/Package=Nonstandard, DC Resistance (DCR)=77mR, LCSC Part Number=C2043078, Manufacturer=TDK, Max Operating Temperature=105°C, Min Operating Temperature=-40°C, Saturation Current=2.5A, Supplier Part Number=810-VLS6045AF-150M, Test Frequency=100kHz, Tolerance=20%, Category="Fixed Inductors", ComponentLink1Description=https://product.tdk.com/info/en/catalog/datasheets/inductor_commercial_power_vls6045af_en.pdf?src-supplier=Digi-Key, ComponentLink1URL=https://product.tdk.com/info/en/catalog/datasheets/inductor_commercial_power_vls6045af_en.pdf?src-supplier=Digi-Key, Core Material=Ferrite, Item Type=Inductor, Manufacturer Part Number=VLS6045AF-150M, Mounting Technology="Surface Mount", Packaging="Cut Tape", Pricing="1=0.44, 10=0.415, 50=0.415, 100=0.3, 1000=0.204, 10000=0.185 (USD)", RoHS=Yes, RoHS Compliant=Yes, Series=VLS, Shielding=Shielded, Stock=1988, Supplier=Mouser
L4: library part LQP03TG6N8H02D, "FIXED IND 6.8NH 200MA 1.15OHM SM", Case/Package=0201, Current Rating=200mA, DC Resistance (DCR)=1.15R, LCSC Part Number=C86120, Manufacturer=Murata, Max Operating Temperature=125°C, Min Operating Temperature=-55°C, Package Quantity=15000, Self Resonant Frequency=5.4GHz, Supplier Part Number=490-LQP03TG6N8H02DCT-ND, Test Frequency=500MHz, Tolerance=3%, Category="Fixed Inductors", ComponentLink1Description=https://datasheet.octopart.com/LQP03TG6N8H02D-Murata-datasheet-140317395.pdf?src-supplier=Farnell, ComponentLink1URL=https://datasheet.octopart.com/LQP03TG6N8H02D-Murata-datasheet-140317395.pdf?src-supplier=Farnell, ComponentLink2Description=https://search.murata.co.jp/Ceramy/image/img/P02/JELF243C-0016.pdf?src-supplier=Digikey, ComponentLink2URL=https://search.murata.co.jp/Ceramy/image/img/P02/JELF243C-0016.pdf?src-supplier=Digikey, DC Current=200mA, Depth=0.33mm, Height - Seated (Max)=0.013inch, Item Type=Inductor, Length=0.024inch, Manufacturer Part Number=LQP03TG6N8H02D, Military Standard=Not, Mounting Technology="Surface Mount", Packaging="Tape and Reel", Pricing="1=0.1, 10=0.025, 25=0.024, 50=0.0204, 100=0.0172, 250=0.01644, 500=0.01494, 1000=0.01255, 2500=0.01075 (USD)", RoHS=Yes, RoHS Compliant=Yes, Series=LQP03TG_02, Shielding=Unshielded, Stock=13400, Supplier=Digikey, Technology="THIN FILM", Width=0.012inch
L5: library part SDCL1608C2N0STDF, "2nH ±0.3nH 0603 Inductors", LCSC Part Number=C370234, Manufacturer=Sunlord, ComponentLink1Description=LCSC, ComponentLink1URL=https://lcsc.com/product-detail/Inductors-SMD_Sunlord-SDCL1608C2N0STDF_C370234.html, Manufacturer Part Number=SDCL1608C2N0STDF
LED1: library part NCD0603R3, "RED LED 0603 Light Emitting Diodes", LCSC Part Number=C3151730, Manufacturer="Foshan NationStar Optoelectronics", Package=0603, ComponentLink1Description=LCSC, ComponentLink1URL=https://www.lcsc.com/product-detail/Light-Emitting-Diodes-LED_Foshan-NationStar-Optoelectronics-NCD0603R3_C3151730.html, Item Type=LED, Manufacturer Part Number=NCD0603R3
LED4 LED7 LED8: library part NCD0603G2, "Emerald 0603 Light Emitting Diodes (LED) ROHS", LCSC Part Number=C87326, Manufacturer="Foshan NationStar Optoelectronics", Package=0603, ComponentLink1Description=LCSC, ComponentLink1URL=https://www.lcsc.com/product-detail/Light-Emitting-Diodes-LED_Foshan-NationStar-Optoelectronics-NCD0603G2_C87326.html, Item Type=LED, Manufacturer Part Number=NCD0603G2
LED5 LED6: library part NCD0603Y2, "yellow 0603 Light Emitting Diodes (LED) ROHS", LCSC Part Number=C89811, Manufacturer="Foshan NationStar Optoelectronics", Package=0603, ComponentLink1Description=LCSC, ComponentLink1URL=https://www.lcsc.com/product-detail/Light-Emitting-Diodes-LED_Foshan-NationStar-Optoelectronics-NCD0603Y2_C89811.html, Item Type=LED, Manufacturer Part Number=NCD0603Y2
LED9: library part NCD0603B3, "blue 0603 Light Emitting Diodes (LED) ROHS", LCSC Part Number=C158101, Manufacturer="Foshan NationStar Optoelectronics", Package=0603, ComponentLink1Description=LCSC, ComponentLink1URL=https://www.lcsc.com/product-detail/Light-Emitting-Diodes-LED_Foshan-NationStar-Optoelectronics-NCD0603B3_C158101.html, Item Type=LED, Manufacturer Part Number=NCD0603B3
P1 P2 P4 P5 P6 P7 P10: "Test Point ON", Item Type="TEST POINT"
Q1: "SOT-23 MOSFETs ROHS", LCSC Part Number=C5122029, Manufacturer="TECH PUBLIC", Package=SOT-23, ComponentLink1Description=LCSC, ComponentLink1URL=https://www.lcsc.com/product-detail/MOSFETs_TECH-PUBLIC-NTR5198NLT1G_C5122029.html, Item Type=MOSFET, Manufacturer Part Number=NTR5198NLT1G
Q2 Q3 Q4 Q5 Q11: "SOT-23 MOSFETs ROHS", LCSC Part Number=C5123904, Manufacturer="TECH PUBLIC", Package=SOT-23, ComponentLink1Description=LCSC, ComponentLink1URL=https://www.lcsc.com/product-detail/MOSFETs_TECH-PUBLIC-FDN335N_C5123904.html, Item Type=Mosfet, Manufacturer Part Number=FDN335N
Q6 Q7 Q8 Q9: "40V 100mW 100@10mA,1V 200mA 300MHz 300mV@50mA,5mA NPN -55℃~+150℃@(Tj) SOT-723 Bipolar Transistors - BJT ROHS", LCSC Part Number=C2923360, Manufacturer="TECH PUBLIC", Package=SOT-723, ComponentLink1Description=LCSC, ComponentLink1URL=https://www.lcsc.com/product-detail/Bipolar-Transistors-BJT_TECH-PUBLIC-MMBT3904M_C2923360.html, Item Type=Mosfet, Manufacturer Part Number=MMBT3904M
Q10: "SOT-23 MOSFETs ROHS", LCSC Part Number=C2890130, Manufacturer="TECH PUBLIC", Package=SOT-23, ComponentLink1Description=LCSC, ComponentLink1URL=https://www.lcsc.com/product-detail/MOSFETs_TECH-PUBLIC-FDN338P_C2890130.html, Item Type=Mosfet, Manufacturer Part Number=FDN338P
R1 R2 R108 R110 R114 R116: library part RC0603JR-0747KL, "RES 47K OHM 5% 1/10W 0603", Case Code (Imperial)=0603, Case Code (Metric)=1608, LCSC Part Number=C127447, Manufacturer=Yageo, Max Operating Temperature=155°C, Max Power Dissipation=100mW, Min Operating Temperature=-55°C, Package Quantity=5000, Resistance=47kR, Resistance Tolerance=1%, Resistor Type="Thick Film", Temperature Coefficient=100ppm/°C, Tolerance=5%, Voltage Rating=50V, Case/Package=0603, Category="Chip SMD Resistors", ComponentLink1Description=http://www.farnell.com/datasheets/443971.pdf, ComponentLink1URL=http://www.farnell.com/datasheets/443971.pdf, ComponentLink2Description=http://www.mouser.com/catalog/specsheets/RC0603.pdf, ComponentLink2URL=http://www.mouser.com/catalog/specsheets/RC0603.pdf, ComponentLink3Description=https://datasheet.ciiva.com/46395/443971-46395003.pdf?src-supplier=Element14, ComponentLink3URL=https://datasheet.ciiva.com/46395/443971-46395003.pdf?src-supplier=Element14, ComponentLink4Description=https://datasheet.ciiva.com/12558/rc0603-272842-12558744.pdf?src-supplier=Mouser, ComponentLink4URL=https://datasheet.ciiva.com/12558/rc0603-272842-12558744.pdf?src-supplier=Mouser, Composition="Thick Film", Construction=Rectangular, Depth=0.8mm, Features="Moisture Resistant", Height=0.45mm, Lead Free="Lead Free", Length=1.6mm, Manufacturer Part Number=RC0603JR-0747KL, Military Standard=Not, Number of Pins=2, Number of Terminations=2, Packaging="Tape and Reel", Power Rating=100mW, Pricing 1="5000=0.0025, 10000=0.0022, 25000=0.0019, 1=0.0011, 6000=0.001 (USD)", Pricing 2="1=0.10000, 10=0.02300, 100=0.00930, 1000=0.00417, 2500=0.00362 (USD)", REACH SVHC="No SVHC", RoHS=Yes, RoHS Compliant=Yes, Series=RC, Size Code=0603, Stock 1=599135, Stock 2=1087850, Supplier 1=Arrow, Supplier 2=Digi-Key, Supplier Part Number 1=RC0603JR-0747KL, Supplier Part Number 2=311-30.0KHRCT-ND, Termination=SMD/SMT, Voltage Rating (DC)=50V, Width=0.8mm
R3 R32 R48: "RELAY TELECOM DPDT 1A 5V", LCSC Part Number=C47190, Manufacturer=Omron, Supplier Part Number=Z128CT-ND, Category="Signal Relays", ComponentLink1Description=https://datasheet.ciiva.com/2416/en-g6k-2416490.pdf?src-supplier=Digikey, ComponentLink1URL=https://datasheet.ciiva.com/2416/en-g6k-2416490.pdf?src-supplier=Digikey, ComponentLink2Description=https://datasheet.ciiva.com/30094/81en-g6k-30094551.pdf?src-supplier=Onlinecomponents.com, ComponentLink2URL=https://datasheet.ciiva.com/30094/81en-g6k-30094551.pdf?src-supplier=Onlinecomponents.com, Item Type=Relay, Manufacturer Part Number=G6K-2F-Y-TR-DC5, Pricing="1=4.49, 10=4.211, 25=3.7428, 50=3.5558, 100=3.3686, 250=2.99428 (USD)", RoHS=Yes, Stock=17486, Supplier=Digikey
R4 R6: library part RC0402FR-075K1L, "RES 5.1K OHM 1% 1/16W 0402", Case Code (Imperial)=0402, Case Code (Metric)=1005, LCSC Part Number=C105872, Manufacturer=Yageo, Max Operating Temperature=155°C, Max Power Dissipation=63mW, Min Operating Temperature=-55°C, Package Quantity=1, Resistance=5.1kR, Resistance Tolerance=1%, Resistor Type="Thick Film", Temperature Coefficient=100ppm/°C, Voltage Rating=50V, Case/Package=0402, Category="Chip SMD Resistors", ComponentLink1Description=https://datasheet.ciiva.com/7983/1018594-7983519.pdf?src-supplier=Element14, ComponentLink1URL=https://datasheet.ciiva.com/7983/1018594-7983519.pdf?src-supplier=Element14, ComponentLink2Description=https://datasheet.ciiva.com/46394/1018594-46394936.pdf?src-supplier=Element14, ComponentLink2URL=https://datasheet.ciiva.com/46394/1018594-46394936.pdf?src-supplier=Element14, ComponentLink3Description=https://datasheet.ciiva.com/2453/pyu-r-int-thick-7-2453401.pdf?src-supplier=Digi-Key, ComponentLink3URL=https://datasheet.ciiva.com/2453/pyu-r-int-thick-7-2453401.pdf?src-supplier=Digi-Key, ComponentLink4Description=https://datasheet.ciiva.com/2453/pyu-r-int-thick-7-2453402.pdf?src-supplier=Digi-Key, ComponentLink4URL=https://datasheet.ciiva.com/2453/pyu-r-int-thick-7-2453402.pdf?src-supplier=Digi-Key, ComponentLink5Description=https://datasheet.ciiva.com/2453/pyu-r-int-thick-7-2453400.pdf?src-supplier=Digi-Key, ComponentLink5URL=https://datasheet.ciiva.com/2453/pyu-r-int-thick-7-2453400.pdf?src-supplier=Digi-Key, ComponentLink6Description=https://datasheet.ciiva.com/12558/pyu-rc0402-51-rohs-l-6-r-8721-12558460.pdf?src-supplier=Mouser, ComponentLink6URL=https://datasheet.ciiva.com/12558/pyu-rc0402-51-rohs-l-6-r-8721-12558460.pdf?src-supplier=Mouser, ComponentLink7Description=https://datasheet.ciiva.com/16744/pyu-rc0402-51-rohs-l-6-r-16744283.pdf?src-supplier=Future+Electronics, ComponentLink7URL=https://datasheet.ciiva.com/16744/pyu-rc0402-51-rohs-l-6-r-16744283.pdf?src-supplier=Future+Electronics, ComponentLink8Description=https://datasheet.ciiva.com/15189/getdatasheetpartid-323636-15189493.pdf?src-supplier=Verical, ComponentLink8URL=https://datasheet.ciiva.com/15189/getdatasheetpartid-323636-15189493.pdf?src-supplier=Verical, Construction=Rectangular, Depth=0.5mm, Features="Moisture Resistant", Height=0.016inch, Item Type=Resistor, Lead Free="Lead Free", Length=1mm, Manufacturer Part Number=RC0402FR-075K1L, Military Standard=Not, Number of Terminations=2, Packaging="Tape and Reel", Power Rating=63mW, Pricing 1="10000=0.00085 (USD)", RoHS=Yes, RoHS Compliant=Yes, Series=RC, Stock 1=65000, Supplier 1=Avnet, Supplier Part Number 1=RC0402FR-075K1L, Technology="THICK FILM", Termination=SMD/SMT, Tolerance=1%, Voltage Rating (DC)=50V, Width=0.02inch, Working Voltage=50V
R5: library part RC0603FR-071ML, "RES SMD 1M OHM 1% 1/10W 0603", Case Code (Imperial)=0603, Case Code (Metric)=1608, LCSC Part Number=C105578, Manufacturer=Yageo, Max Operating Temperature=155°C, Min Operating Temperature=-55°C, Package Quantity=5000, Power Rating=100mW, Resistance=1MR, Supplier Part Number 1=311-1.00MHRDKR-ND, Temperature Coefficient=100ppm/°C, Tolerance=1%, Voltage Rating=50V, Case/Package=0603, ComponentLink1Description=http://www.farnell.com/datasheets/2167052.pdf?src-supplier=Mouser, ComponentLink1URL=http://www.farnell.com/datasheets/2167052.pdf?src-supplier=Mouser, ComponentLink2Description=http://www.farnell.com/datasheets/2167052.pdf?src-supplier=Element14, ComponentLink2URL=http://www.farnell.com/datasheets/2167052.pdf?src-supplier=Element14, ComponentLink3Description=http://documents.rs-components.com/techlib://itc_doclist_GB.htm?stockno=5048956&src-supplier=RSComponents, ComponentLink3URL=http://documents.rs-components.com/techlib://itc_doclist_GB.htm?stockno=5048956&src-supplier=RSComponents, Composition="Thick Film", Depth=0.8mm, Height=0.45mm, Item Type=Resistor, Lead Free="Lead Free", Length=1.6mm, Manufacturer Part Number=RC0603FR-071ML, Military Standard=Not, Number of Pins=2, Packaging="Tape and Reel", Pricing 1="1=0.1, 10=0.023, 100=0.0094, 1000=0.00421, 2500=0.00366 (USD)", REACH SVHC="No SVHC", Stock 1=3824601, Supplier 1=Digi-Key, Termination=SMD/SMT, Voltage Rating (DC)=50V, Width=0.8mm
R7: library part SCR0402F60K4, "60.4kΩ 50V 62.5mW Thick Film Resistors ±1% 0402 Chip Resistor - Surface Mount ROHS", LCSC Part Number=C3016055, Manufacturer=VO, Package=0402, ComponentLink1Description=LCSC, ComponentLink1URL=https://www.lcsc.com/product-detail/Chip-Resistor-Surface-Mount_VO-SCR0402F60K4_C3016055.html, Item Type=Resistor, Manufacturer Part Number=SCR0402F60K4
R8: library part RMC040223.2K1%N, "23.2kΩ 62.5mW ±1% 0402 Chip Resistor - Surface Mount ROHS", LCSC Part Number=C269399, Manufacturer=TyoHM, Package=0402, ComponentLink1Description=LCSC, ComponentLink1URL=https://www.lcsc.com/product-detail/Chip-Resistor-Surface-Mount_TyoHM-RMC040223-2K1-N_C269399.html, Item Type=Resistor, Manufacturer Part Number=RMC040223.2K1%N
R9: library part FRC0402F1152TS, "11.5kΩ 50V 62.5mW Thick Film Resistors ±100ppm/℃ ±1%  0402 Chip Resistor - Surface Mount ROHS", LCSC Part Number=C2933068, Manufacturer=FOJAN, Package=0402, ComponentLink1Description=LCSC, ComponentLink1URL=https://www.lcsc.com/product-detail/Chip-Resistor-Surface-Mount_FOJAN-FRC0402F1152TS_C2933068.html, Item Type=Resistor, Manufacturer Part Number=FRC0402F1152TS
R10: library part RC0201FR-071KL, "RES 1K OHM 1% 1/20W 0201", Case Code (Imperial)=0201, Case Code (Metric)=0603, LCSC Part Number=C138165, Manufacturer=Yageo, Max Operating Temperature=125°C, Max Power Dissipation=50mW, Min Operating Temperature=-55°C, Package Quantity=10000, Resistance Tolerance=1%, Resistor Type="Thick Film", Supplier Part Number=311-1KMCT-ND, Temperature Coefficient=200ppm/°C, Voltage Rating=25V, Case/Package=0201, Category="Chip SMD Resistors", ComponentLink1Description=https://datasheet.ciiva.com/7672/1563626-7672204.pdf?src-supplier=Element14, ComponentLink1URL=https://datasheet.ciiva.com/7672/1563626-7672204.pdf?src-supplier=Element14, ComponentLink2Description=https://datasheet.ciiva.com/22698/1563626-22698505.pdf?src-supplier=Element14, ComponentLink2URL=https://datasheet.ciiva.com/22698/1563626-22698505.pdf?src-supplier=Element14, ComponentLink3Description=https://datasheet.ciiva.com/29721/pyu-r-int-thick-7-29721196.pdf?src-supplier=Digi-Key, ComponentLink3URL=https://datasheet.ciiva.com/29721/pyu-r-int-thick-7-29721196.pdf?src-supplier=Digi-Key, ComponentLink4Description=https://datasheet.ciiva.com/29721/pyu-r-int-thick-7-29721195.pdf?src-supplier=Digi-Key, ComponentLink4URL=https://datasheet.ciiva.com/29721/pyu-r-int-thick-7-29721195.pdf?src-supplier=Digi-Key, ComponentLink5Description=https://datasheet.ciiva.com/8896/pyu-rc0201-51-rohs-l-8-8896174.pdf?src-supplier=Avnet, ComponentLink5URL=https://datasheet.ciiva.com/8896/pyu-rc0201-51-rohs-l-8-8896174.pdf?src-supplier=Avnet, Construction=Rectangular, Contact Plating=Tin,Matte, Depth=0.3mm, Features="Moisture Resistant", Height=0.01inch, Item Type=Resistor, Lead Free=5697LeadFree, Length=0.024inch, Manufacturer Part Number=RC0201FR-071KL, Military Standard=Not, Number of Terminations=2, Packaging="Tape and Reel", Power Rating=50mW, Pricing="1=0.1, 10=0.027, 50=0.0172, 100=0.0143, 500=0.00988, 1000=0.00854, 5000=0.00629 (USD)", Reach SVHC Compliant=Unknown, RoHS=Yes, RoHS Compliant=Yes, Series=RC, Stock=5606340, Supplier=Digi-Key, Technology="THICK FILM", Termination=SMD/SMT, Tolerance=1%, Voltage Rating (DC)=25V, Width=0.012inch, Working Voltage=25V
R11 R19: library part RC0201JR-07100KL, "RES SMD 100K OHM 5% 1/20W 0201", Case Code (Imperial)=0201, Case Code (Metric)=0603, LCSC Part Number=C106230, Manufacturer=Yageo, Max Operating Temperature=125°C, Max Power Dissipation=50mW, Min Operating Temperature=-55°C, Package Quantity=1, Resistance=100kR, Resistance Tolerance=5%, Resistor Type="Thick Film", Temperature Coefficient=200ppm/°C, Voltage Rating=25V, Case/Package=0201, Category="Chip SMD Resistors", ComponentLink1Description=https://datasheet.ciiva.com/2462/pyu-r-int-thick-7-2462817.pdf?src-supplier=Digi-Key, ComponentLink1URL=https://datasheet.ciiva.com/2462/pyu-r-int-thick-7-2462817.pdf?src-supplier=Digi-Key, ComponentLink2Description=https://datasheet.ciiva.com/2462/pyu-r-int-thick-7-2462818.pdf?src-supplier=Digi-Key, ComponentLink2URL=https://datasheet.ciiva.com/2462/pyu-r-int-thick-7-2462818.pdf?src-supplier=Digi-Key, ComponentLink3Description=https://datasheet.ciiva.com/2462/pyu-r-int-thick-7-2462819.pdf?src-supplier=Digi-Key, ComponentLink3URL=https://datasheet.ciiva.com/2462/pyu-r-int-thick-7-2462819.pdf?src-supplier=Digi-Key, ComponentLink4Description=https://datasheet.ciiva.com/8888/pyu-rc0201-51-rohs-l-8-8888005.pdf?src-supplier=Avnet, ComponentLink4URL=https://datasheet.ciiva.com/8888/pyu-rc0201-51-rohs-l-8-8888005.pdf?src-supplier=Avnet, ComponentLink5Description=https://datasheet.ciiva.com/8896/pyu-rc0201-51-rohs-l-8-8896213.pdf?src-supplier=Avnet, ComponentLink5URL=https://datasheet.ciiva.com/8896/pyu-rc0201-51-rohs-l-8-8896213.pdf?src-supplier=Avnet, ComponentLink6Description=https://datasheet.ciiva.com/28395/pyu-rc0201-51-rohs-l-8-28395542.pdf?src-supplier=Avnet+Europe, ComponentLink6URL=https://datasheet.ciiva.com/28395/pyu-rc0201-51-rohs-l-8-28395542.pdf?src-supplier=Avnet+Europe, ComponentLink7Description=https://datasheet.ciiva.com/28639/1421516-28639863.pdf?src-supplier=Element14, ComponentLink7URL=https://datasheet.ciiva.com/28639/1421516-28639863.pdf?src-supplier=Element14, ComponentLink8Description=https://datasheet.ciiva.com/7672/1563626-7672249.pdf?src-supplier=Element14, ComponentLink8URL=https://datasheet.ciiva.com/7672/1563626-7672249.pdf?src-supplier=Element14, ComponentLink9Description=https://datasheet.ciiva.com/7672/1563626-7672250.pdf?src-supplier=Element14, ComponentLink9URL=https://datasheet.ciiva.com/7672/1563626-7672250.pdf?src-supplier=Element14, Construction=Rectangular, Contact Plating=Tin,Matte, Depth=0.3mm, Features="Moisture Resistant", Height=0.01inch, Lead Free="Lead Free", Length=0.6mm, Manufacturer Part Number=RC0201JR-07100KL, Military Standard=Not, Number of Terminations=2, Packaging="Tape and Reel", Power Rating=50mW, Pricing 1="1=0.09240, 10=0.09140, 25=0.05450, 10000=0.00340, 100000=0.00320, 1000000=0.00180, 5000000=0.00110 (USD)", Radiation Hardening=No, REACH SVHC="No SVHC", RoHS=Yes, RoHS Compliant=Yes, Series=RC, Size Code=0201, Stock 1=76, Supplier 1="Arrow Electronics", Supplier Part Number 1=RC0201JR-07100KL, Termination=SMD/SMT, Tolerance=5%, Voltage Rating (DC)=25V, Weight=6E-06oz, Width=0.012inch
R12 R21: library part RC-01W471JT, "50mW ±5% ±200ppm/℃ 470Ω 0201 Chip Resistor - Surface Mount ROHS", LCSC Part Number=C304545, Manufacturer=FH, Package=0201, ComponentLink1Description=LCSC, ComponentLink1URL=https://www.lcsc.com/product-detail/Chip-Resistor-Surface-Mount_FH-Guangdong-Fenghua-Advanced-Tech-RC-01W471JT_C304545.html, Item Type=Resistor, Manufacturer Part Number=RC-01W471JT
R13 R16 R17 R18 R26 R34 R51 R52 R59 R94 R95 R96 R97 R98 R103 R104 R120 R133 R139: library part RC0201FR-0710KL, "RES SMD 10K OHM 1% 1/20W 0201", LCSC Part Number=C106225, Manufacturer=Yageo, Package=0201, ComponentLink7Description=LCSC, ComponentLink7URL=https://www.lcsc.com/product-detail/Chip-Resistor-Surface-Mount_YAGEO-RC0201FR-0710KL_C106225.html, Item Type=Resistor, Manufacturer Part Number=RC0201FR-0710KL